# Allegro board 980K2-260817_261120-1.brd

Outline 419.1 x 474.98 mm; copper layers: TOP, L02_GND, L03_DP, L04_GND, L05_DP, L06_GND, L07_VI, L08_GND, L09_VI, L10_GND, L11_VI, L12_GND, L13_VI, L14_GND, L15_5V, L16_5V, L17_C-BIT, L18_C-BIT, L19_GND, L20_VI, L21_GND, L22_VI, L23_GND, L24_VI, L25_GND, L26_VI, L27_GND, L28_DP, L29_GND, L30_DP, L31_GND, BOTTOM. Coordinates in mm from the lower left corner of the outline.

## Placement (name value [footprint] x y rotation side)
BC9  0.1U-50-X-S4-TDK  [C0402]  86.11 107.82 180 bottom
BR5  1K-1-S4  [R0402]  86.11 106.3 0 bottom
BR6  1K-1-S4  [R0402]  86.11 103.5 0 bottom
BR7  0-5-S6  [R0603]  83.44 106.3 180 bottom
BR8  0-5-S4  [R0402]  86.11 105.03 180 bottom
BR9  0-5-S4  [R0402]  86.11 102.24 180 bottom
BU1  AT24C512C-SSHM-T-SOIC8  [SO8_206X127MM]  91.06 105.66 180 bottom
C48  0.01U-100-X7R-S6-MU  [C0603]  147.57 273.87 90 bottom
C49  0.01U-100-X7R-S6-MU  [C0603]  136.27 268.99 270 bottom
C50  0.01U-100-X7R-S6-MU  [C0603]  142.28 268.54 270 bottom
C53  1U-16-X5R-S4-YA  [C0402]  142.24 261.62 270 bottom
C54  2.2U-16-X-S4-MU  [C0402]  136.53 261.62 270 bottom
C58  1U-16-X5R-S4-YA  [C0402]  142.11 257.68 270 bottom
C59  4.7U-100-X-SB-MU  [C1210]  140.59 246.51 270 bottom
C60  0.01U-100-X7R-S6-MU  [C0603]  147.01 259.72 0 bottom
C61  0.01U-100-X7R-S6-MU  [C0603]  156.88 264.78 180 bottom
C62  2.2U-16-X-S4-MU  [C0402]  157.07 259.72 0 bottom
C63  0.01U-100-X7R-S6-MU  [C0603]  157.73 261.82 90 bottom
C64  0.01U-100-X7R-S6-MU  [C0603]  156.88 267.82 180 bottom
C65  0.1U-25-X7R-S4-MU  [C0402]  157.73 271.37 90 bottom
C66  0.1U-25-X7R-S4-MU  [C0402]  152.65 276.61 180 bottom
C67  0.1U-25-X7R-S4-MU  [C0402]  150.24 278.13 180 bottom
C68  0.1U-25-X7R-S4-MU  [C0402]  147.83 282.7 180 bottom
C69  0.01U-100-X7R-S6-MU  [C0603]  151.96 259.72 0 bottom
C70  0.1U-25-X7R-S4-MU  [C0402]  122.8 294.89 180 bottom
C71  0.1U-25-X7R-S4-MU  [C0402]  129.42 294.89 180 bottom
C72  0.1U-25-X7R-S4-MU  [C0402]  158.75 227.33 0 bottom
C73  0.1U-25-X7R-S4-MU  [C0402]  153.67 227.33 0 bottom
C74  0.1U-25-X7R-S4-MU  [C0402]  157.73 273.91 90 bottom
CT1  47U-16-X5R-SB-MU  [C1210]  88.14 153.16 180 bottom
CT2  10U-16-X5R-S8-TY  [C0805]  108.2 164.59 90 bottom
CT3  22U-16-X-S8-MU  [C0805]  110.49 164.59 90 bottom
CT7  47U-16-X5R-SB-MU  [C1210]  88.14 132.84 180 bottom
CT8  10U-16-X5R-S8-TY  [C0805]  110.49 144.27 90 bottom
CT9  22U-16-X-S8-MU  [C0805]  108.2 144.27 90 bottom
F1  C1F8-0.25A-SA  [FUSE_1206_H1P05MM]  88.14 156.72 0 bottom
F2  C1F8-0.25A-SA  [FUSE_1206_H1P05MM]  88.14 136.4 0 bottom
FD1  -  [FD_040_V2]  95.25 123.19 0 top
FD2  -  [FD_040_V2]  323.85 123.19 0 top
FD3  -  [FD_040_V2]  323.85 351.79 0 top
FD4  -  [FD_040_V2]  95.25 351.79 0 top
FD5  -  [FD_040_V2]  323.85 123.19 180 bottom
FD6  -  [FD_040_V2]  95.25 123.19 180 bottom
FD7  -  [FD_040_V2]  95.25 351.79 180 bottom
FD8  -  [FD_040_V2]  323.85 351.79 180 bottom
FD9  -  [FD_040_V2]  19.05 123.19 0 top
FD10  -  [FD_040_V2]  400.05 123.19 0 top
FD11  -  [FD_040_V2]  400.05 351.79 0 top
FD12  -  [FD_040_V2]  19.05 351.79 0 top
FD13  -  [FD_040_V2]  400.05 123.19 180 bottom
FD14  -  [FD_040_V2]  19.05 123.19 180 bottom
FD15  -  [FD_040_V2]  19.05 351.79 180 bottom
FD16  -  [FD_040_V2]  400.05 351.79 180 bottom
K1  UA2-5NJ-A-V3  [RL_NECUA2_5V_V3]  138.43 290.63 270 bottom
K2  G3VM-201DR  [RL_G3VM201DR_200V]  144.15 277.5 0 bottom
K3  G3VM-201DR  [RL_G3VM201DR_200V]  134.49 273.18 90 bottom
K4  G3VM-201DR  [RL_G3VM201DR_200V]  144.15 291.47 0 bottom
K5  G3VM-51UR-5V-VSON4  [RL_G3VM_4P_VSON4]  139.95 268.99 0 bottom
K6  G3VM-51UR-5V-VSON4  [RL_G3VM_4P_VSON4]  139.95 266.19 0 bottom
K7  G3VM-51UR-5V-VSON4  [RL_G3VM_4P_VSON4]  139.95 264.16 0 bottom
K8  G3VM-51UR-5V-VSON4  [RL_G3VM_4P_VSON4]  139.95 261.62 0 bottom
K9  G3VM-51UR-5V-VSON4  [RL_G3VM_4P_VSON4]  134.24 261.62 0 bottom
K10  G3VM-51UR-5V-VSON4  [RL_G3VM_4P_VSON4]  135.38 264.16 0 bottom
K11  G3VM-51UR-5V-VSON4  [RL_G3VM_4P_VSON4]  143.76 257.3 90 bottom
K12  G3VM-51UR-5V-VSON4  [RL_G3VM_4P_VSON4]  143.76 252.48 90 bottom
K13  G3VM-51UR-5V-VSON4  [RL_G3VM_4P_VSON4]  143.76 246.51 90 bottom
K14  G3VM-51UR-5V-VSON4  [RL_G3VM_4P_VSON4]  146.56 252.48 90 bottom
K15  UA2-5NJ-A-V3  [RL_NECUA2_5V_V3]  135.25 242.75 270 bottom
K16  G3VM-51UR-5V-VSON4  [RL_G3VM_4P_VSON4]  146.56 257.3 90 bottom
K17  G3VM-51UR-5V-VSON4  [RL_G3VM_4P_VSON4]  148.72 257.3 90 bottom
K18  G3VM-51UR-5V-VSON4  [RL_G3VM_4P_VSON4]  148.72 252.48 90 bottom
K19  G3VM-51UR-5V-VSON4  [RL_G3VM_4P_VSON4]  151.51 257.3 90 bottom
K20  G3VM-51UR-5V-VSON4  [RL_G3VM_4P_VSON4]  151.51 252.48 90 bottom
K21  G3VM-51UR-5V-VSON4  [RL_G3VM_4P_VSON4]  153.67 257.3 90 bottom
K22  G3VM-51UR-5V-VSON4  [RL_G3VM_4P_VSON4]  153.67 252.48 90 bottom
K23  UA2-5NJ-A-V3  [RL_NECUA2_5V_V3]  152.78 242.75 270 bottom
K24  UA2-5NJ-A-V3  [RL_NECUA2_5V_V3]  161.04 242.75 270 bottom
K25  G3VM-51UR-5V-VSON4  [RL_G3VM_4P_VSON4]  156.97 257.3 90 bottom
K26  G3VM-51UR-5V-VSON4  [RL_G3VM_4P_VSON4]  156.97 252.48 90 bottom
K27  G3VM-51UR-5V-VSON4  [RL_G3VM_4P_VSON4]  160.15 261.37 180 bottom
K28  G3VM-51UR-5V-VSON4  [RL_G3VM_4P_VSON4]  164.72 261.37 180 bottom
K29  G3VM-51UR-5V-VSON4  [RL_G3VM_4P_VSON4]  169.29 261.37 180 bottom
K30  G3VM-51UR-5V-VSON4  [RL_G3VM_4P_VSON4]  160.15 265.18 180 bottom
K31  G3VM-51UR-5V-VSON4  [RL_G3VM_4P_VSON4]  164.72 265.18 180 bottom
K32  G3VM-51UR-5V-VSON4  [RL_G3VM_4P_VSON4]  169.29 265.18 180 bottom
K33  G3VM-51UR-5V-VSON4  [RL_G3VM_4P_VSON4]  160.15 268.22 180 bottom
K34  G3VM-51UR-5V-VSON4  [RL_G3VM_4P_VSON4]  164.72 268.22 180 bottom
K35  G3VM-51UR-5V-VSON4  [RL_G3VM_4P_VSON4]  169.29 268.22 180 bottom
K36  G3VM-51UR-5V-VSON4  [RL_G3VM_4P_VSON4]  160.15 271.27 180 bottom
K37  G3VM-51UR-5V-VSON4  [RL_G3VM_4P_VSON4]  164.72 271.27 180 bottom
K38  G3VM-51UR-5V-VSON4  [RL_G3VM_4P_VSON4]  160.15 273.81 180 bottom
K39  G3VM-51UR-5V-VSON4  [RL_G3VM_4P_VSON4]  164.72 273.81 180 bottom
K40  G3VM-51UR-5V-VSON4  [RL_G3VM_4P_VSON4]  155.58 273.05 270 bottom
K41  G3VM-51UR-5V-VSON4  [RL_G3VM_4P_VSON4]  155.58 277.62 270 bottom
K42  G3VM-51UR-5V-VSON4  [RL_G3VM_4P_VSON4]  155.58 282.19 270 bottom
K43  G3VM-51UR-5V-VSON4  [RL_G3VM_4P_VSON4]  152.65 273.05 270 bottom
K44  G3VM-51UR-5V-VSON4  [RL_G3VM_4P_VSON4]  152.65 278.89 270 bottom
K45  G3VM-51UR-5V-VSON4  [RL_G3VM_4P_VSON4]  152.65 283.46 270 bottom
K46  G3VM-51UR-5V-VSON4  [RL_G3VM_4P_VSON4]  150.24 274.57 270 bottom
K47  G3VM-51UR-5V-VSON4  [RL_G3VM_4P_VSON4]  150.24 280.42 270 bottom
K48  G3VM-51UR-5V-VSON4  [RL_G3VM_4P_VSON4]  150.24 284.99 270 bottom
K49  G3VM-51UR-5V-VSON4  [RL_G3VM_4P_VSON4]  147.83 284.99 270 bottom
K50  G3VM-51UR-5V-VSON4  [RL_G3VM_4P_VSON4]  147.83 279.15 270 bottom
K51  G3VM-51UR-5V-VSON4  [RL_G3VM_4P_VSON4]  148.72 246.51 270 bottom
K52  G3VM-51UR-5V-VSON4  [RL_G3VM_4P_VSON4]  148.72 241.17 90 bottom
K53  G3VM-51UR-5V-VSON4  [RL_G3VM_4P_VSON4]  156.97 246.51 270 bottom
K54  G3VM-51UR-5V-VSON4  [RL_G3VM_4P_VSON4]  156.97 241.17 90 bottom
K55  G3VM-51UR-5V-VSON4  [RL_G3VM_4P_VSON4]  123.44 292.35 0 bottom
K56  G3VM-201DR  [RL_G3VM201DR_200V]  128.4 288.67 90 bottom
K57  G3VM-51UR-5V-VSON4  [RL_G3VM_4P_VSON4]  158.12 234.57 270 bottom
K58  G3VM-51UR-5V-VSON4  [RL_G3VM_4P_VSON4]  156.08 234.57 270 bottom
K59  G3VM-51UR-5V-VSON4  [RL_G3VM_4P_VSON4]  153.04 234.57 270 bottom
K60  G3VM-51UR-5V-VSON4  [RL_G3VM_4P_VSON4]  151 234.57 270 bottom
K61  G3VM-51UR-5V-VSON4  [RL_G3VM_4P_VSON4]  130.05 292.35 0 bottom
LD1  LDG-2-S6  [LED_0603]  88.91 165.19 0 top
LD3  LDG-2-S6  [LED_0603]  88.91 144.87 0 top
LT1  L10U-16A-S16.5X15.5-PU  [IND_16P5X15P5MM]  98.93 156.59 0 bottom
LT3  L10U-16A-S16.5X15.5-PU  [IND_16P5X15P5MM]  98.93 136.27 0 bottom
M1  PG_LTXDX_F_X1_OUTLINE_TD_V2  [PG_LTXDX_F_X1_OUTLINE_TD_COHU]  209.55 237.49 0 top
NOREF  -  []  208.42 208.62 0 top
NOREF#2  -  []  151.95 178.07 0 top
NOREF#3  -  []  151.79 256.75 0 top
NOREF#4  -  []  193.27 198.18 0 top
NOREF#5  -  []  133.45 244.35 0 top
NOREF#6  -  []  104.35 456.29 0 top
NOREF#7  -  []  198.11 172.1 0 top
NOREF#8  -  []  88.16 144.87 0 top
NOREF#9  -  []  275.05 214.25 0 top
NOREF#10  -  []  146.83 256.75 0 top
NOREF#11  -  []  164.64 181.15 90 top
NOREF#12  -  []  302.59 389.27 90 top
NOREF#13  -  []  241.44 184.35 0 top
NOREF#14  -  []  279.22 239.57 90 top
NOREF#15  -  []  253.78 207.01 0 top
NOREF#16  -  []  226.96 191.6 90 top
NOREF#17  -  []  232.25 272.17 0 top
NOREF#18  -  []  188.19 247.71 0 top
NOREF#19  -  []  100.95 17.15 90 top
NOREF#20  -  []  135.15 265.24 0 top
NOREF#21  -  []  164.95 204.23 90 top
NOREF#22  -  []  189.84 273.7 0 top
NOREF#23  -  []  145.42 286.99 90 top
NOREF#24  -  []  196.7 193.03 90 top
NOREF#25  -  []  277.25 256.75 0 top
NOREF#26  -  []  236.1 280.99 90 top
NOREF#27  -  []  125.25 291.4 0 top
NOREF#28  -  []  151.46 167 0 top
NOREF#29  -  []  142.03 229.03 90 top
NOREF#30  -  []  266.69 297.01 90 top
NOREF#31  -  []  168.42 260.97 90 top
NOREF#32  -  []  150.97 179.57 90 top
NOREF#33  -  []  213.78 267.01 0 top
NOREF#34  -  []  159.27 265.58 0 top
NOREF#35  -  []  128.94 221.73 0 top
NOREF#36  -  []  271.79 191.93 0 top
NOREF#37  -  []  239.72 223.79 90 top
NOREF#38  -  []  215.02 268.14 90 top
NOREF#39  -  []  249.52 200.42 90 top
NOREF#40  -  []  228.99 240.62 0 top
NOREF#41  -  []  267.3 226.19 0 top
NOREF#42  -  []  248.54 260.64 90 top
NOREF#43  -  []  188.32 253.35 0 top
NOREF#44  -  []  227.8 265.39 90 top
NOREF#45  -  []  137.25 176.5 90 top
NOREF#46  -  []  293.99 17.15 0 top
NOREF#47  -  []  180.95 206.12 90 top
NOREF#48  -  []  132.55 224.49 0 top
NOREF#49  -  []  246.32 206.13 0 top
NOREF#50  -  []  169.52 267.27 90 top
NOREF#51  -  []  203.84 270.87 90 top
NOREF#52  -  []  156.7 197.85 90 top
NOREF#53  -  []  266.83 251.93 0 top
NOREF#54  -  []  230.98 184.35 0 top
NOREF#55  -  []  199.06 238.07 0 top
NOREF#56  -  []  156.1 211.85 90 top
NOREF#57  -  []  185.41 273.02 90 top
NOREF#58  -  []  190.73 19.69 90 top
NOREF#59  -  []  215.84 202.57 90 top
NOREF#60  -  []  185.42 274.72 90 top
NOREF#61  -  []  91.03 148.19 0 top
NOREF#62  -  []  159.4 267.5 90 top
NOREF#63  -  []  277.5 185.31 90 top
NOREF#64  -  []  191.53 173.37 90 top
NOREF#65  -  []  168.54 268.95 0 top
NOREF#66  -  []  228.32 198.18 0 top
NOREF#67  -  []  191.73 172.54 0 top
NOREF#68  -  []  179.73 178.35 0 top
NOREF#69  -  []  209.49 220.89 0 top
NOREF#70  -  []  210.02 214.45 0 top
NOREF#71  -  []  323.77 454.29 90 top
NOREF#72  -  []  123.91 295.42 90 top
NOREF#73  -  []  203.97 274.54 0 top
NOREF#74  -  []  259.08 261.22 0 top
NOREF#75  -  []  260.95 261.55 90 top
NOREF#76  -  []  157.71 173.69 0 top
NOREF#77  -  []  191.19 288.49 0 top
NOREF#78  -  []  156.1 220.99 90 top
NOREF#79  -  []  190.77 279.22 90 top
NOREF#80  -  []  154.84 18.69 90 top
NOREF#81  -  []  188.32 258.18 0 top
NOREF#82  -  []  249.52 267.27 90 top
NOREF#83  -  []  143.61 396.29 0 top
NOREF#84  -  []  193.39 197.85 90 top
NOREF#85  -  []  148.44 257.85 90 top
NOREF#86  -  []  270.98 244.35 0 top
NOREF#87  -  []  260.83 268.59 90 top
NOREF#88  -  []  239.4 213.09 90 top
NOREF#89  -  []  289.52 204.23 90 top
NOREF#90  -  []  250.92 291.95 90 top
NOREF#91  -  []  250.89 209.17 0 top
NOREF#92  -  []  245.38 226.23 0 top
NOREF#93  -  []  264.04 191.93 0 top
NOREF#94  -  []  192.25 218.02 0 top
NOREF#95  -  []  178.97 271.91 90 top
NOREF#96  -  []  262.87 213.02 0 top
NOREF#97  -  []  89.74 135.6 0 top
NOREF#98  -  []  173.34 17.15 90 top
NOREF#99  -  []  272.25 212.18 90 top
NOREF#100  -  []  194.07 196.43 90 top
NOREF#101  -  []  202.85 237.22 0 top
NOREF#102  -  []  288.54 267.5 90 top
NOREF#103  -  []  163.84 267.82 90 top
NOREF#104  -  []  147.43 218.27 0 top
NOREF#105  -  []  144.16 245.63 90 top
NOREF#106  -  []  181.55 209.94 90 top
NOREF#107  -  []  173.62 229.09 90 top
NOREF#108  -  []  230.77 273.37 90 top
NOREF#109  -  []  229.84 213.7 0 top
NOREF#110  -  []  265.41 286.99 90 top
NOREF#111  -  []  201.44 244.35 0 top
NOREF#112  -  []  274.39 286.59 90 top
NOREF#113  -  []  184.16 245.63 90 top
NOREF#114  -  []  149.84 224.11 0 top
NOREF#115  -  []  195.68 173.69 90 top
NOREF#116  -  []  158.04 228.3 0 top
NOREF#117  -  []  168.54 260.64 90 top
NOREF#118  -  []  255.02 268.14 90 top
NOREF#119  -  []  160.23 236.17 90 top
NOREF#120  -  []  250.89 202.32 0 top
NOREF#121  -  []  213.24 261.55 0 top
NOREF#122  -  []  178.35 271.84 0 top
NOREF#123  -  []  205.04 233.3 90 top
NOREF#124  -  []  243.84 200.97 90 top
NOREF#125  -  []  271.91 251.6 90 top
NOREF#126  -  []  235.58 202.67 90 top
NOREF#127  -  []  180.95 266.12 90 top
NOREF#128  -  []  178.35 269.04 0 top
NOREF#129  -  []  139.72 273.6 90 top
NOREF#130  -  []  199.06 178.07 0 top
NOREF#131  -  []  245.38 226.23 0 top
NOREF#132  -  []  146.28 193.03 90 top
NOREF#133  -  []  106.68 128.02 90 top
NOREF#134  -  []  243.84 214.21 0 top
NOREF#135  -  []  227.3 226.19 0 top
NOREF#136  -  []  265.61 252.78 0 top
NOREF#137  -  []  217.25 236.5 90 top
NOREF#138  -  []  155.68 173.69 90 top
NOREF#139  -  []  231.79 256.75 0 top
NOREF#140  -  []  231.11 258.18 0 top
NOREF#141  -  []  136.98 205.11 90 top
NOREF#142  -  []  244.64 241.15 90 top
NOREF#143  -  []  180.95 268.91 90 top
NOREF#144  -  []  187.3 226.19 0 top
NOREF#145  -  []  268.44 193.03 90 top
NOREF#146  -  []  273.6 282.39 0 top
NOREF#147  -  []  187.05 209.24 0 top
NOREF#148  -  []  258.95 201.55 0 top
NOREF#149  -  []  272.87 248.11 90 top
NOREF#150  -  []  321.5 18.69 0 top
NOREF#151  -  []  199.27 208.62 0 top
NOREF#152  -  []  243.84 273.41 90 top
NOREF#153  -  []  218.35 211.84 0 top
NOREF#154  -  []  138.56 246.51 0 top
NOREF#155  -  []  214.43 292.23 0 top
NOREF#156  -  []  243.84 260.97 90 top
NOREF#157  -  []  186.7 237.02 90 top
NOREF#158  -  []  214.07 270.89 90 top
NOREF#159  -  []  151.46 227 0 top
NOREF#160  -  []  170.92 291.95 90 top
NOREF#161  -  []  216.83 227.03 0 top
NOREF#162  -  []  276.1 220.99 90 top
NOREF#163  -  []  211.05 232.28 90 top
NOREF#164  -  []  129.36 361.96 0 top
NOREF#165  -  []  207.98 226.38 90 top
NOREF#166  -  []  275.17 212.18 0 top
NOREF#167  -  []  232.25 222.59 0 top
NOREF#168  -  []  269.84 279.54 0 top
NOREF#169  -  []  80.49 155.57 0 top
NOREF#170  -  []  235.17 276.75 0 top
NOREF#171  -  []  155.17 272.17 0 top
NOREF#172  -  []  159.4 202.09 0 top
NOREF#173  -  []  230.97 239.57 90 top
NOREF#174  -  []  243.04 236.5 90 top
NOREF#175  -  []  229.84 273.7 90 top
NOREF#176  -  []  216.26 263.76 90 top
NOREF#177  -  []  201.12 248.11 90 top
NOREF#178  -  []  152.13 220.09 0 top
NOREF#179  -  []  209.55 237.49 90 top
NOREF#180  -  []  239.65 212.56 0 top
NOREF#181  -  []  173.34 17.15 0 top
NOREF#182  -  []  195.17 281.32 90 top
NOREF#183  -  []  196.02 257.6 0 top
NOREF#184  -  []  279.27 264.78 90 top
NOREF#185  -  []  183.49 253.03 90 top
NOREF#186  -  []  188.99 191.93 0 top
NOREF#187  -  []  144.04 251.93 0 top
NOREF#188  -  []  208.54 207.5 90 top
NOREF#189  -  []  153.03 172.1 0 top
NOREF#190  -  []  208.42 268.62 0 top
NOREF#191  -  []  261.03 267.69 90 top
NOREF#192  -  []  231.19 288.49 0 top
NOREF#193  -  []  211.14 458.49 0 top
NOREF#194  -  []  276.61 233.37 90 top
NOREF#195  -  []  204.95 272.86 90 top
NOREF#196  -  []  270.97 250.88 90 top
NOREF#197  -  []  182.81 252.78 0 top
NOREF#198  -  []  269.72 286.19 0 top
NOREF#199  -  []  118.64 291.4 90 top
NOREF#200  -  []  271.19 218.07 0 top
NOREF#201  -  []  117.23 452.29 90 top
NOREF#202  -  []  251.65 293.3 90 top
NOREF#203  -  []  188.32 182.05 0 top
NOREF#204  -  []  239.4 214.54 0 top
NOREF#205  -  []  254.04 210.63 90 top
NOREF#206  -  []  273.18 184.35 0 top
NOREF#207  -  []  279.4 214.54 0 top
NOREF#208  -  []  150.88 228.6 90 top
NOREF#209  -  []  230.77 223.79 90 top
NOREF#210  -  []  168.94 221.73 0 top
NOREF#211  -  []  191.87 396.29 0 top
NOREF#212  -  []  270.77 273.37 90 top
NOREF#213  -  []  267.05 269.24 0 top
NOREF#214  -  []  269.12 196.43 90 top
NOREF#215  -  []  229.24 185.31 90 top
NOREF#216  -  []  186.16 253.35 0 top
NOREF#217  -  []  271.95 178.07 0 top
NOREF#218  -  []  214.38 264.09 0 top
NOREF#219  -  []  231.79 196.75 0 top
NOREF#220  -  []  147.05 269.24 0 top
NOREF#221  -  []  196.1 280.99 90 top
NOREF#222  -  []  269.12 240.3 90 top
NOREF#223  -  []  208.42 267.82 90 top
NOREF#224  -  []  233.18 222.26 90 top
NOREF#225  -  []  180.83 268.59 90 top
NOREF#226  -  []  224.16 196.43 90 top
NOREF#227  -  []  274.39 216.17 90 top
NOREF#228  -  []  218.95 206.12 0 top
NOREF#229  -  []  119.48 456.29 90 top
NOREF#230  -  []  235.68 233.69 0 top
NOREF#231  -  []  226.16 212.17 90 top
NOREF#232  -  []  204.95 200.42 90 top
NOREF#233  -  []  229.84 284.11 90 top
NOREF#234  -  []  266.28 193.03 90 top
NOREF#235  -  []  271.18 239.15 0 top
NOREF#236  -  []  248.54 262.09 0 top
NOREF#237  -  []  253.64 239.09 0 top
NOREF#238  -  []  157.25 196.75 0 top
NOREF#239  -  []  255.65 244.35 0 top
NOREF#240  -  []  191.76 227.33 0 top
NOREF#241  -  []  140.95 201.55 90 top
NOREF#242  -  []  255.02 208.14 90 top
NOREF#243  -  []  227.43 218.27 90 top
NOREF#244  -  []  255.11 201.22 90 top
NOREF#245  -  []  284.95 267.27 90 top
NOREF#246  -  []  198.11 232.1 0 top
NOREF#247  -  []  190.77 213.37 90 top
NOREF#248  -  []  212.64 264.47 0 top
NOREF#249  -  []  244.64 181.15 90 top
NOREF#250  -  []  152.46 247.68 90 top
NOREF#251  -  []  168.54 267.5 90 top
NOREF#252  -  []  95.33 20.69 90 top
NOREF#253  -  []  159.4 208.95 0 top
NOREF#254  -  []  131.26 184.35 0 top
NOREF#255  -  []  156.7 241.72 90 top
NOREF#256  -  []  238.99 19.69 90 top
NOREF#257  -  []  241.12 188.11 90 top
NOREF#258  -  []  89.76 165.64 0 top
NOREF#259  -  []  145.42 273.02 90 top
NOREF#260  -  []  266.28 253.03 90 top
NOREF#261  -  []  252.55 284.49 0 top
NOREF#262  -  []  262.81 246.81 0 top
NOREF#263  -  []  149.12 256.43 90 top
NOREF#264  -  []  106.68 128.02 0 top
NOREF#265  -  []  134.43 292.23 0 top
NOREF#266  -  []  226.16 226.14 90 top
NOREF#267  -  []  239.4 202.09 0 top
NOREF#268  -  []  136.5 285.91 90 top
NOREF#269  -  []  211.65 293.3 90 top
NOREF#270  -  []  271.19 228.49 0 top
NOREF#271  -  []  149.84 284.11 90 top
NOREF#272  -  []  138.95 264.09 0 top
NOREF#273  -  []  268.81 195.7 90 top
NOREF#274  -  []  150.98 244.35 0 top
NOREF#275  -  []  237.37 196.43 90 top
NOREF#276  -  []  236.54 167 0 top
NOREF#277  -  []  172.55 250.49 90 top
NOREF#278  -  []  203.97 214.54 0 top
NOREF#279  -  []  279.44 179.15 0 top
NOREF#280  -  []  132.26 248.4 0 top
NOREF#281  -  []  168.45 295.2 0 top
NOREF#282  -  []  192.25 222.59 0 top
NOREF#283  -  []  260.59 244.98 90 top
NOREF#284  -  []  191.11 200.17 90 top
NOREF#285  -  []  290.89 269.17 0 top
NOREF#286  -  []  284.95 212.86 90 top
NOREF#287  -  []  183.49 197.85 90 top
NOREF#288  -  []  268.32 242.05 0 top
NOREF#289  -  []  272.11 171.4 0 top
NOREF#290  -  []  271.11 198.18 0 top
NOREF#291  -  []  268.78 288.49 0 top
NOREF#292  -  []  276.57 258.18 0 top
NOREF#293  -  []  150.15 266.89 90 top
NOREF#294  -  []  156.02 181.47 0 top
NOREF#295  -  []  154.07 196.43 90 top
NOREF#296  -  []  269.84 213.7 90 top
NOREF#297  -  []  271.24 193.03 90 top
NOREF#298  -  []  235.92 195.7 90 top
NOREF#299  -  []  278.13 389.27 90 top
NOREF#300  -  []  273.18 211.85 90 top
NOREF#301  -  []  288.54 200.64 90 top
NOREF#302  -  []  239.4 262.09 0 top
NOREF#303  -  []  209.55 237.49 0 top
NOREF#304  -  []  85.59 155.57 90 top
NOREF#305  -  []  205.38 286.23 0 top
NOREF#306  -  []  148.32 198.18 0 top
NOREF#307  -  []  133.95 281.02 90 top
NOREF#308  -  []  269.84 219.54 90 top
NOREF#309  -  []  203.97 273.09 90 top
NOREF#310  -  []  253.24 261.55 0 top
NOREF#311  -  []  243.84 268.62 0 top
NOREF#312  -  []  163.97 268.95 0 top
NOREF#313  -  []  151.7 280.49 90 top
NOREF#314  -  []  211.25 184.35 0 top
NOREF#315  -  []  232.63 173.69 90 top
NOREF#316  -  []  227.43 284.11 0 top
NOREF#317  -  []  183.49 257.85 90 top
NOREF#318  -  []  233.76 250.88 90 top
NOREF#319  -  []  172.87 287.4 90 top
NOREF#320  -  []  159.27 271.67 0 top
NOREF#321  -  []  136.63 292.23 0 top
NOREF#322  -  []  219.73 178.35 0 top
NOREF#323  -  []  294.09 207.27 90 top
NOREF#324  -  []  228.44 181.72 90 top
NOREF#325  -  []  239.27 211.67 0 top
NOREF#326  -  []  273.27 253.35 0 top
NOREF#327  -  []  220.95 266.12 90 top
NOREF#328  -  []  141.55 202.57 90 top
NOREF#329  -  []  209.55 237.49 0 top
NOREF#330  -  []  131.05 245.49 90 top
NOREF#331  -  []  276.52 281.12 0 top
NOREF#332  -  []  99.98 392.33 90 top
NOREF#333  -  []  194.39 216.17 90 top
NOREF#334  -  []  243.84 207.82 90 top
NOREF#335  -  []  163.97 265.9 0 top
NOREF#336  -  []  171.05 185.49 90 top
NOREF#337  -  []  84.45 359.42 0 top
NOREF#338  -  []  229.84 224.11 90 top
NOREF#339  -  []  157.03 178.07 0 top
NOREF#340  -  []  151.79 251.93 0 top
NOREF#341  -  []  211.25 184.35 0 top
NOREF#342  -  []  214.04 210.63 90 top
NOREF#343  -  []  141.85 246.47 0 top
NOREF#344  -  []  199.27 268.62 0 top
NOREF#345  -  []  174.43 292.23 0 top
NOREF#346  -  []  272.13 220.09 0 top
NOREF#347  -  []  190.77 273.37 90 top
NOREF#348  -  []  203.97 262.09 0 top
NOREF#349  -  []  271.18 179.15 0 top
NOREF#350  -  []  151.24 257.85 90 top
NOREF#351  -  []  203.4 296.38 0 top
NOREF#352  -  []  244.95 207.27 90 top
NOREF#353  -  []  163.84 268.62 0 top
NOREF#354  -  []  226.01 190.88 90 top
NOREF#355  -  []  248.54 264.45 90 top
NOREF#356  -  []  184.04 191.93 0 top
NOREF#357  -  []  180.95 204.09 90 top
NOREF#358  -  []  197.37 256.43 90 top
NOREF#359  -  []  152.63 232.86 0 top
NOREF#360  -  []  268.78 244.35 0 top
NOREF#361  -  []  228.44 193.03 90 top
NOREF#362  -  []  236.8 280.49 90 top
NOREF#363  -  []  122.2 178.35 0 top
NOREF#364  -  []  223.49 257.85 90 top
NOREF#365  -  []  190.15 266.89 90 top
NOREF#366  -  []  293.99 17.15 90 top
NOREF#367  -  []  156.57 258.18 0 top
NOREF#368  -  []  196.81 232.54 0 top
NOREF#369  -  []  243.92 229.94 0 top
NOREF#370  -  []  190.97 179.57 90 top
NOREF#371  -  []  175.11 261.22 90 top
NOREF#372  -  []  153.6 226.96 0 top
NOREF#373  -  []  264.04 251.93 0 top
NOREF#374  -  []  155.05 274.25 0 top
NOREF#375  -  []  191.95 238.07 0 top
NOREF#376  -  []  268.99 256.75 0 top
NOREF#377  -  []  129.44 260.67 0 top
NOREF#378  -  []  183.49 247.06 90 top
NOREF#379  -  []  153.83 172.21 90 top
NOREF#380  -  []  241.75 212.22 0 top
NOREF#381  -  []  131.05 232.28 90 top
NOREF#382  -  []  196.84 227.33 0 top
NOREF#383  -  []  182.81 197.6 0 top
NOREF#384  -  []  159.27 211.67 0 top
NOREF#385  -  []  232.13 284.66 0 top
NOREF#386  -  []  156.57 242.05 0 top
NOREF#387  -  []  203.04 176.5 90 top
NOREF#388  -  []  233.94 191.93 0 top
NOREF#389  -  []  222.03 229.03 90 top
NOREF#390  -  []  152.25 222.59 90 top
NOREF#391  -  []  273.18 244.35 0 top
NOREF#392  -  []  157.25 240.62 0 top
NOREF#393  -  []  249.17 291.95 0 top
NOREF#394  -  []  189.84 219.54 0 top
NOREF#395  -  []  157.5 245.31 90 top
NOREF#396  -  []  213.65 239.15 0 top
NOREF#397  -  []  225.42 274.72 90 top
NOREF#398  -  []  146.16 258.18 0 top
NOREF#399  -  []  209.55 237.49 0 top
NOREF#400  -  []  191.24 193.03 90 top
NOREF#401  -  []  228.99 196.75 0 top
NOREF#402  -  []  152.25 212.18 0 top
NOREF#403  -  []  202.44 232.28 0 top
NOREF#404  -  []  149.72 281.62 0 top
NOREF#405  -  []  236.61 233.37 90 top
NOREF#406  -  []  275.17 216.75 90 top
NOREF#407  -  []  248.42 201.77 0 top
NOREF#408  -  []  169.52 260.42 90 top
NOREF#409  -  []  231.98 280.75 90 top
NOREF#410  -  []  193.18 277.69 90 top
NOREF#411  -  []  274.78 176.5 90 top
NOREF#412  -  []  264.24 20.69 90 top
NOREF#413  -  []  231.73 232.54 0 top
NOREF#414  -  []  260.95 268.91 90 top
NOREF#415  -  []  232.25 278.02 0 top
NOREF#416  -  []  157.25 251.93 0 top
NOREF#417  -  []  267.99 238.35 0 top
NOREF#418  -  []  181.55 269.94 90 top
NOREF#419  -  []  269.84 284.11 90 top
NOREF#420  -  []  184.04 245.96 0 top
NOREF#421  -  []  192.13 224.66 0 top
NOREF#422  -  []  288.54 262.09 0 top
NOREF#423  -  []  211.21 234.89 90 top
NOREF#424  -  []  263.89 185.24 90 top
NOREF#425  -  []  176.55 220.49 0 top
NOREF#426  -  []  253.36 261.22 0 top
NOREF#427  -  []  164.95 200.42 90 top
NOREF#428  -  []  289.52 267.27 90 top
NOREF#429  -  []  138.95 206.12 0 top
NOREF#430  -  []  152.25 218.02 0 top
NOREF#431  -  []  210.89 202.32 0 top
NOREF#432  -  []  93.68 136.27 0 top
NOREF#433  -  []  196.52 281.12 0 top
NOREF#434  -  []  188.35 217.95 90 top
NOREF#435  -  []  236.57 185.63 0 top
NOREF#436  -  []  219.55 180.49 90 top
NOREF#437  -  []  138.95 261.55 0 top
NOREF#438  -  []  199.27 213.41 90 top
NOREF#439  -  []  199.4 212 0 top
NOREF#440  -  []  196.79 231.3 0 top
NOREF#441  -  []  151.11 258.18 0 top
NOREF#442  -  []  150.77 213.37 90 top
NOREF#443  -  []  141.03 207.69 90 top
NOREF#444  -  []  227.8 204.99 90 top
NOREF#445  -  []  86.61 132.84 0 top
NOREF#446  -  []  213.45 244.35 0 top
NOREF#447  -  []  186.83 196.75 0 top
NOREF#448  -  []  218.35 204.47 0 top
NOREF#449  -  []  266.96 191.6 90 top
NOREF#450  -  []  233.39 253.03 90 top
NOREF#451  -  []  221.85 292.49 0 top
NOREF#452  -  []  232.51 235.77 0 top
NOREF#453  -  []  192.13 274.25 0 top
NOREF#454  -  []  224.04 191.93 0 top
NOREF#455  -  []  237.92 250.01 0 top
NOREF#456  -  []  270.88 168.6 90 top
NOREF#457  -  []  281.12 188.11 90 top
NOREF#458  -  []  273.27 193.35 0 top
NOREF#459  -  []  170.02 274.45 0 top
NOREF#460  -  []  157.03 238.07 0 top
NOREF#461  -  []  228.32 242.05 0 top
NOREF#462  -  []  197.71 173.69 0 top
NOREF#463  -  []  203.97 208.95 0 top
NOREF#464  -  []  151.71 231.3 0 top
NOREF#465  -  []  135.84 202.57 90 top
NOREF#466  -  []  224.04 251.93 0 top
NOREF#467  -  []  123.4 236.38 0 top
NOREF#468  -  []  267.8 264.99 90 top
NOREF#469  -  []  207.95 226.12 90 top
NOREF#470  -  []  159.27 268.62 0 top
NOREF#471  -  []  145.42 214.72 90 top
NOREF#472  -  []  209.52 270.32 90 top
NOREF#473  -  []  266.01 195.7 90 top
NOREF#474  -  []  184.16 256.43 90 top
NOREF#475  -  []  193.6 276.55 0 top
NOREF#476  -  []  231.18 179.15 0 top
NOREF#477  -  []  228.81 190.88 90 top
NOREF#478  -  []  188.44 193.03 90 top
NOREF#479  -  []  251.05 232.28 90 top
NOREF#480  -  []  247.98 286.38 90 top
NOREF#481  -  []  156.02 192.78 0 top
NOREF#482  -  []  271.11 193.35 0 top
NOREF#483  -  []  233.83 172.21 90 top
NOREF#484  -  []  192.25 282.59 0 top
NOREF#485  -  []  191.91 191.6 90 top
NOREF#486  -  []  288.42 260.97 90 top
NOREF#487  -  []  232.87 248.11 90 top
NOREF#488  -  []  187.01 458.49 0 top
NOREF#489  -  []  232.25 272.17 90 top
NOREF#490  -  []  227.77 252.78 0 top
NOREF#491  -  []  258.35 207.01 0 top
NOREF#492  -  []  270.15 206.89 90 top
NOREF#493  -  []  171.05 245.49 90 top
NOREF#494  -  []  147.43 218.27 90 top
NOREF#495  -  []  277.18 176.17 90 top
NOREF#496  -  []  163.97 213.09 90 top
NOREF#497  -  []  161.84 235.2 0 top
NOREF#498  -  []  250.89 206.13 0 top
NOREF#499  -  []  276.38 181.15 90 top
NOREF#500  -  []  283.97 270.55 90 top
NOREF#501  -  []  281.75 269.17 0 top
NOREF#502  -  []  181.03 267.69 90 top
NOREF#503  -  []  163.97 212 0 top
NOREF#504  -  []  268.19 187.71 0 top
NOREF#505  -  []  309.55 14.59 90 top
NOREF#506  -  []  191.95 178.07 0 top
NOREF#507  -  []  199.4 200.64 90 top
NOREF#508  -  []  258.85 241.15 90 top
NOREF#509  -  []  275.05 218.82 0 top
NOREF#510  -  []  283.97 208.95 0 top
NOREF#511  -  []  227.43 284.11 90 top
NOREF#512  -  []  243.97 213.09 90 top
NOREF#513  -  []  235.05 274.25 0 top
NOREF#514  -  []  196.33 167.9 90 top
NOREF#515  -  []  254.43 292.23 0 top
NOREF#516  -  []  191.71 231.3 0 top
NOREF#517  -  []  188.78 228.49 0 top
NOREF#518  -  []  179.72 213.6 90 top
NOREF#519  -  []  186.43 282.49 90 top
NOREF#520  -  []  195.68 173.69 0 top
NOREF#521  -  []  151.79 196.75 0 top
NOREF#522  -  []  148.19 247.71 0 top
NOREF#523  -  []  274.39 226.59 90 top
NOREF#524  -  []  268.78 222.65 0 top
NOREF#525  -  []  178.95 201.55 0 top
NOREF#526  -  []  153.56 173.37 90 top
NOREF#527  -  []  275.68 173.69 90 top
NOREF#528  -  []  139.72 213.6 90 top
NOREF#529  -  []  231.95 238.07 0 top
NOREF#530  -  []  248.42 265.58 0 top
NOREF#531  -  []  246.32 269.17 0 top
NOREF#532  -  []  267.77 252.78 0 top
NOREF#533  -  []  261.03 207.69 90 top
NOREF#534  -  []  190.6 233.69 0 top
NOREF#535  -  []  150.6 233.69 90 top
NOREF#536  -  []  254.51 263.76 0 top
NOREF#537  -  []  324.88 21.69 90 top
NOREF#538  -  []  251.25 184.35 0 top
NOREF#539  -  []  233.18 277.69 90 top
NOREF#540  -  []  156.57 193.35 0 top
NOREF#541  -  []  195.92 255.7 90 top
NOREF#542  -  []  191.79 196.75 0 top
NOREF#543  -  []  248.54 207.5 90 top
NOREF#544  -  []  243.84 208.62 0 top
NOREF#545  -  []  180.83 261.22 90 top
NOREF#546  -  []  88.14 151.13 90 top
NOREF#547  -  []  207.04 239.09 0 top
NOREF#548  -  []  153.18 271.85 90 top
NOREF#549  -  []  139.49 266.31 90 top
NOREF#550  -  []  193.39 193.03 90 top
NOREF#551  -  []  140.59 184.98 90 top
NOREF#552  -  []  174.09 207.27 90 top
NOREF#553  -  []  161.12 188.11 90 top
NOREF#554  -  []  150.41 228.7 90 top
NOREF#555  -  []  237.37 191.6 90 top
NOREF#556  -  []  284.64 241.15 90 top
NOREF#557  -  []  233.18 271.85 90 top
NOREF#558  -  []  152.72 247.68 0 top
NOREF#559  -  []  223.36 187.38 0 top
NOREF#560  -  []  175.24 261.55 90 top
NOREF#561  -  []  180.83 203.76 90 top
NOREF#562  -  []  131.26 244.35 0 top
NOREF#563  -  []  148.32 242.05 0 top
NOREF#564  -  []  228.32 245.63 0 top
NOREF#565  -  []  197.04 244.35 0 top
NOREF#566  -  []  174.09 260.42 90 top
NOREF#567  -  []  279.65 272.56 0 top
NOREF#568  -  []  279.72 279.22 90 top
NOREF#569  -  []  157.04 244.35 0 top
NOREF#570  -  []  193.18 184.35 0 top
NOREF#571  -  []  240.13 456.29 90 top
NOREF#572  -  []  94.87 108.59 0 top
NOREF#573  -  []  184.04 256.75 0 top
NOREF#574  -  []  199.4 214.54 0 top
NOREF#575  -  []  135.66 184.35 0 top
NOREF#576  -  []  283.84 270.87 90 top
NOREF#577  -  []  163.92 289.94 0 top
NOREF#578  -  []  159.72 214.65 90 top
NOREF#579  -  []  193.6 226.96 0 top
NOREF#580  -  []  187.77 252.78 0 top
NOREF#581  -  []  222.81 192.78 0 top
NOREF#582  -  []  279.27 268.62 0 top
NOREF#583  -  []  239.27 268.62 0 top
NOREF#584  -  []  190.6 233.69 90 top
NOREF#585  -  []  228.95 266.89 0 top
NOREF#586  -  []  173.78 267.01 0 top
NOREF#587  -  []  192.72 192.78 0 top
NOREF#588  -  []  221.55 269.94 90 top
NOREF#589  -  []  272.72 252.78 0 top
NOREF#590  -  []  220.43 284.38 90 top
NOREF#591  -  []  192.11 231.4 0 top
NOREF#592  -  []  195.17 221.32 0 top
NOREF#593  -  []  140.04 265.53 90 top
NOREF#594  -  []  90.48 16.49 0 top
NOREF#595  -  []  149.29 289.79 0 top
NOREF#596  -  []  191.18 179.15 0 top
NOREF#597  -  []  168.42 207.82 90 top
NOREF#598  -  []  226.01 250.88 90 top
NOREF#599  -  []  199.27 214.21 0 top
NOREF#600  -  []  261.55 205.11 90 top
NOREF#601  -  []  245.73 17.15 90 top
NOREF#602  -  []  148.95 266.89 0 top
NOREF#603  -  []  254.09 267.27 90 top
NOREF#604  -  []  154.33 267.37 90 top
NOREF#605  -  []  129.05 232.28 0 top
NOREF#606  -  []  199.4 208.95 0 top
NOREF#607  -  []  199.22 179.57 90 top
NOREF#608  -  []  244.61 234.24 90 top
NOREF#609  -  []  194.33 207.37 90 top
NOREF#610  -  []  94.87 102.74 90 top
NOREF#611  -  []  153.18 184.35 0 top
NOREF#612  -  []  259.55 294.49 0 top
NOREF#613  -  []  222.87 273.02 0 top
NOREF#614  -  []  136.26 263.76 90 top
NOREF#615  -  []  228.32 245.63 90 top
NOREF#616  -  []  216 456.29 0 top
NOREF#617  -  []  242.44 292.28 0 top
NOREF#618  -  []  236.7 257.85 90 top
NOREF#619  -  []  161.84 295.2 0 top
NOREF#620  -  []  271.71 171.3 0 top
NOREF#621  -  []  181.6 248.12 0 top
NOREF#622  -  []  248.54 268.95 0 top
NOREF#623  -  []  228.32 182.05 0 top
NOREF#624  -  []  276.7 197.85 90 top
NOREF#625  -  []  188.78 244.35 0 top
NOREF#626  -  []  211.05 245.49 90 top
NOREF#627  -  []  267.45 269.24 0 top
NOREF#628  -  []  139.08 265.79 0 top
NOREF#629  -  []  187.77 257.6 0 top
NOREF#630  -  []  170.89 269.17 0 top
NOREF#631  -  []  163.84 214.21 0 top
NOREF#632  -  []  197.37 180.3 90 top
NOREF#633  -  []  231.19 223.92 0 top
NOREF#634  -  []  136.26 203.76 90 top
NOREF#635  -  []  219.73 178.35 0 top
NOREF#636  -  []  227.43 278.27 0 top
NOREF#637  -  []  199.72 214.65 90 top
NOREF#638  -  []  230.77 279.22 90 top
NOREF#639  -  []  266.43 222.5 90 top
NOREF#640  -  []  142.88 226.99 0 top
NOREF#641  -  []  222.87 226.99 0 top
NOREF#642  -  []  146.16 193.35 0 top
NOREF#643  -  []  247.98 226.38 90 top
NOREF#644  -  []  159.65 212.56 0 top
NOREF#645  -  []  147.43 278.27 90 top
NOREF#646  -  []  272.25 222.59 90 top
NOREF#647  -  []  145.61 254.08 0 top
NOREF#648  -  []  186.01 184.91 90 top
NOREF#649  -  []  147.43 284.11 0 top
NOREF#650  -  []  246.32 209.17 0 top
NOREF#651  -  []  188.78 282.65 0 top
NOREF#652  -  []  192.25 218.02 90 top
NOREF#653  -  []  252.64 264.47 0 top
NOREF#654  -  []  239.24 184.35 0 top
NOREF#655  -  []  254.43 232.23 0 top
NOREF#656  -  []  203.84 201.77 0 top
NOREF#657  -  []  270.77 219.22 90 top
NOREF#658  -  []  156.45 187.71 0 top
NOREF#659  -  []  208.54 200.64 90 top
NOREF#660  -  []  204.95 207.27 90 top
NOREF#661  -  []  193.27 258.18 0 top
NOREF#662  -  []  228.99 180.62 0 top
NOREF#663  -  []  276.52 276.55 0 top
NOREF#664  -  []  233.76 190.88 90 top
NOREF#665  -  []  224.16 191.6 90 top
NOREF#666  -  []  194.78 236.5 90 top
NOREF#667  -  []  239.72 274.65 90 top
NOREF#668  -  []  192.25 278.02 0 top
NOREF#669  -  []  276.02 192.78 0 top
NOREF#670  -  []  158.64 233.37 90 top
NOREF#671  -  []  234.07 256.43 90 top
NOREF#672  -  []  155.17 221.32 0 top
NOREF#673  -  []  279.4 208.95 0 top
NOREF#674  -  []  263.49 253.03 90 top
NOREF#675  -  []  267.9 205.84 90 top
NOREF#676  -  []  178.95 264.09 0 top
NOREF#677  -  []  260.83 263.76 90 top
NOREF#678  -  []  168.42 200.97 90 top
NOREF#679  -  []  239.4 207.5 90 top
NOREF#680  -  []  140.95 206.12 90 top
NOREF#681  -  []  186.16 286.14 90 top
NOREF#682  -  []  283.84 213.41 90 top
NOREF#683  -  []  272.13 214.25 0 top
NOREF#684  -  []  156.1 276.42 90 top
NOREF#685  -  []  294.09 264.23 90 top
NOREF#686  -  []  195.17 276.75 90 top
NOREF#687  -  []  227.77 197.6 0 top
NOREF#688  -  []  179.08 268.59 0 top
NOREF#689  -  []  162.2 238.35 0 top
NOREF#690  -  []  239.27 214.21 0 top
NOREF#691  -  []  268.78 228.49 0 top
NOREF#692  -  []  145.61 192.78 0 top
NOREF#693  -  []  190.41 228.7 90 top
NOREF#694  -  []  239.06 238.07 0 top
NOREF#695  -  []  270.97 179.57 90 top
NOREF#696  -  []  283.97 204.45 90 top
NOREF#697  -  []  269.67 190.01 0 top
NOREF#698  -  []  149.84 213.7 0 top
NOREF#699  -  []  199.4 213.09 90 top
NOREF#700  -  []  251.05 289.49 0 top
NOREF#701  -  []  151.79 191.93 0 top
NOREF#702  -  []  229.72 226.19 0 top
NOREF#703  -  []  268.44 197.85 90 top
NOREF#704  -  []  193.27 193.35 0 top
NOREF#705  -  []  187.03 231.4 0 top
NOREF#706  -  []  283.97 268.95 0 top
NOREF#707  -  []  251.05 245.49 90 top
NOREF#708  -  []  201.41 227.9 90 top
NOREF#709  -  []  156.52 216.55 0 top
NOREF#710  -  []  268.99 191.93 0 top
NOREF#711  -  []  199.4 267.5 90 top
NOREF#712  -  []  149.72 221.62 0 top
NOREF#713  -  []  163.92 229.94 0 top
NOREF#714  -  []  195.49 168.7 90 top
NOREF#715  -  []  261.59 234.15 0 top
NOREF#716  -  []  218.95 268.91 0 top
NOREF#717  -  []  218.83 232.23 0 top
NOREF#718  -  []  230.88 228.6 90 top
NOREF#719  -  []  227.9 265.84 90 top
NOREF#720  -  []  163.84 265.58 0 top
NOREF#721  -  []  216 456.29 90 top
NOREF#722  -  []  288.39 456.29 90 top
NOREF#723  -  []  235.49 168.7 90 top
NOREF#724  -  []  133.36 261.22 0 top
NOREF#725  -  []  279.72 219.22 90 top
NOREF#726  -  []  228.78 244.35 0 top
NOREF#727  -  []  216.83 287.03 0 top
NOREF#728  -  []  274.07 191.6 90 top
NOREF#729  -  []  189.72 275.77 0 top
NOREF#730  -  []  165.04 233.3 90 top
NOREF#731  -  []  194.39 286.59 90 top
NOREF#732  -  []  178.97 18.69 90 top
NOREF#733  -  []  267.8 209.99 0 top
NOREF#734  -  []  193.39 253.03 90 top
NOREF#735  -  []  229.72 221.62 0 top
NOREF#736  -  []  157.92 190.01 0 top
NOREF#737  -  []  143.49 193.03 90 top
NOREF#738  -  []  197.92 190.01 0 top
NOREF#739  -  []  276.45 187.71 0 top
NOREF#740  -  []  243.84 205.58 0 top
NOREF#741  -  []  275.17 281.32 0 top
NOREF#742  -  []  147.43 278.27 0 top
NOREF#743  -  []  270.6 173.69 90 top
NOREF#744  -  []  62.86 375.04 0 top
NOREF#745  -  []  227.9 205.84 90 top
NOREF#746  -  []  279.27 267.82 90 top
NOREF#747  -  []  124.55 148.49 90 top
NOREF#748  -  []  199.22 250.88 90 top
NOREF#749  -  []  203.84 205.58 0 top
NOREF#750  -  []  250.02 274.45 0 top
NOREF#751  -  []  189.12 180.3 90 top
NOREF#752  -  []  218.95 204.09 0 top
NOREF#753  -  []  221.59 234.15 0 top
NOREF#754  -  []  183.49 193.03 90 top
NOREF#755  -  []  248.42 208.62 0 top
NOREF#756  -  []  256.55 280.49 0 top
NOREF#757  -  []  229.72 275.77 0 top
NOREF#758  -  []  159.27 270.87 90 top
NOREF#759  -  []  196.8 274.65 90 top
NOREF#760  -  []  276.57 242.05 0 top
NOREF#761  -  []  249.49 220.89 0 top
NOREF#762  -  []  235.05 218.82 0 top
NOREF#763  -  []  216.63 232.23 0 top
NOREF#764  -  []  193.98 238.07 0 top
NOREF#765  -  []  152.51 175.77 0 top
NOREF#766  -  []  206.32 262.32 0 top
NOREF#767  -  []  152.25 278.02 0 top
NOREF#768  -  []  230.97 179.57 90 top
NOREF#769  -  []  168.54 264.45 90 top
NOREF#770  -  []  209.52 272.86 90 top
NOREF#771  -  []  143.36 187.38 0 top
NOREF#772  -  []  270.6 233.69 0 top
NOREF#773  -  []  270.77 213.37 90 top
NOREF#774  -  []  268.89 392.33 90 top
NOREF#775  -  []  199.72 223.79 90 top
NOREF#776  -  []  186.16 198.18 0 top
NOREF#777  -  []  210.02 274.45 0 top
NOREF#778  -  []  161.44 184.35 0 top
NOREF#779  -  []  275.05 223.39 0 top
NOREF#780  -  []  279.72 223.79 90 top
NOREF#781  -  []  268.32 258.18 0 top
NOREF#782  -  []  238.11 172.1 0 top
NOREF#783  -  []  273.94 256.75 0 top
NOREF#784  -  []  270.56 192.78 0 top
NOREF#785  -  []  229.12 180.3 90 top
NOREF#786  -  []  242.2 178.35 0 top
NOREF#787  -  []  178.95 206.12 0 top
NOREF#788  -  []  284.95 210.32 90 top
NOREF#789  -  []  276.02 257.6 0 top
NOREF#790  -  []  219.72 273.6 90 top
NOREF#791  -  []  206.32 272.22 0 top
NOREF#792  -  []  140.83 268.59 90 top
NOREF#793  -  []  246.73 82.65 0 top
NOREF#794  -  []  203.97 210.55 90 top
NOREF#795  -  []  281.75 209.17 0 top
NOREF#796  -  []  149.84 219.54 90 top
NOREF#797  -  []  236.52 281.12 0 top
NOREF#798  -  []  203.84 200.97 90 top
NOREF#799  -  []  273.94 191.93 0 top
NOREF#800  -  []  159.27 200.97 90 top
NOREF#801  -  []  230.77 213.37 90 top
NOREF#802  -  []  239.4 264.45 90 top
NOREF#803  -  []  161.75 262.32 0 top
NOREF#804  -  []  196.57 245.63 90 top
NOREF#805  -  []  161.75 209.17 0 top
NOREF#806  -  []  176.38 264.09 90 top
NOREF#807  -  []  140.83 203.76 90 top
NOREF#808  -  []  171.05 292.28 90 top
NOREF#809  -  []  209.52 264.23 90 top
NOREF#810  -  []  246.32 272.22 0 top
NOREF#811  -  []  268.32 193.35 0 top
NOREF#812  -  []  132.87 227.4 90 top
NOREF#813  -  []  276.57 182.05 0 top
NOREF#814  -  []  189.84 284.11 90 top
NOREF#815  -  []  149.68 334.65 0 top
NOREF#816  -  []  188.81 190.88 90 top
NOREF#817  -  []  148.95 206.89 0 top
NOREF#818  -  []  122.2 178.35 0 top
NOREF#819  -  []  199.27 264.78 90 top
NOREF#820  -  []  241.84 295.2 0 top
NOREF#821  -  []  141.55 207.14 90 top
NOREF#822  -  []  133.62 289.09 90 top
NOREF#823  -  []  242.2 178.35 0 top
NOREF#824  -  []  277.04 184.35 0 top
NOREF#825  -  []  147.9 205.84 90 top
NOREF#826  -  []  186.16 212.17 90 top
NOREF#827  -  []  267.99 178.35 0 top
NOREF#828  -  []  254.38 204.09 0 top
NOREF#829  -  []  208.54 264.45 90 top
NOREF#830  -  []  228.32 185.63 90 top
NOREF#831  -  []  209.55 237.49 0 top
NOREF#832  -  []  235.17 272.17 90 top
NOREF#833  -  []  174.43 232.23 0 top
NOREF#834  -  []  260.83 205.79 90 top
NOREF#835  -  []  231.53 233.37 90 top
NOREF#836  -  []  189.84 213.7 90 top
NOREF#837  -  []  128.45 235.2 0 top
NOREF#838  -  []  239.44 239.15 0 top
NOREF#839  -  []  275.68 233.69 90 top
NOREF#840  -  []  186.16 258.18 0 top
NOREF#841  -  []  267.9 265.84 90 top
NOREF#842  -  []  187.8 204.99 90 top
NOREF#843  -  []  218.35 271.84 0 top
NOREF#844  -  []  173.45 184.35 0 top
NOREF#845  -  []  156.02 236.37 0 top
NOREF#846  -  []  196.7 257.85 90 top
NOREF#847  -  []  154.39 216.17 90 top
NOREF#848  -  []  193.18 222.26 90 top
NOREF#849  -  []  247.95 226.12 90 top
NOREF#850  -  []  106.68 148.34 90 top
NOREF#851  -  []  293.02 392.33 90 top
NOREF#852  -  []  197.5 185.31 90 top
NOREF#853  -  []  317.15 392.33 90 top
NOREF#854  -  []  170.89 262.32 0 top
NOREF#855  -  []  266.16 200.17 90 top
NOREF#856  -  []  142.81 247.68 0 top
NOREF#857  -  []  281.75 262.32 0 top
NOREF#858  -  []  134.07 210.89 90 top
NOREF#859  -  []  268.78 282.65 0 top
NOREF#860  -  []  272.63 172.86 0 top
NOREF#861  -  []  150.41 168.7 90 top
NOREF#862  -  []  156.81 232.54 0 top
NOREF#863  -  []  150.21 82.65 0 top
NOREF#864  -  []  106.83 148.19 90 top
NOREF#865  -  []  142.81 192.78 0 top
NOREF#866  -  []  259.08 203.76 0 top
NOREF#867  -  []  267.05 209.24 0 top
NOREF#868  -  []  196.57 258.18 0 top
NOREF#869  -  []  288.42 201.77 0 top
NOREF#870  -  []  153.6 216.55 0 top
NOREF#871  -  []  276.33 227.9 90 top
NOREF#872  -  []  258.95 206.12 0 top
NOREF#873  -  []  227.23 18.69 90 top
NOREF#874  -  []  203.97 212 0 top
NOREF#875  -  []  123.4 281.8 0 top
NOREF#876  -  []  192.25 212.18 90 top
NOREF#877  -  []  180.95 208.91 90 top
NOREF#878  -  []  209.52 210.32 90 top
NOREF#879  -  []  204.95 264.23 90 top
NOREF#880  -  []  277.74 166.36 90 top
NOREF#881  -  []  209.52 204.23 90 top
NOREF#882  -  []  150.56 252.5 0 top
NOREF#883  -  []  175.11 201.22 90 top
NOREF#884  -  []  286.32 272.22 0 top
NOREF#885  -  []  228.95 206.89 0 top
NOREF#886  -  []  279.22 190.88 90 top
NOREF#887  -  []  190.77 283.79 90 top
NOREF#888  -  []  154.63 286.99 0 top
NOREF#889  -  []  147.77 181.47 0 top
NOREF#890  -  []  156.1 280.99 90 top
NOREF#891  -  []  180.43 284.38 90 top
NOREF#892  -  []  124.44 292.28 90 top
NOREF#893  -  []  221.03 267.69 90 top
NOREF#894  -  []  239.27 200.97 90 top
NOREF#895  -  []  312.52 456.29 90 top
NOREF#896  -  []  160.23 176.17 90 top
NOREF#897  -  []  179.08 205.79 0 top
NOREF#898  -  []  154.39 226.59 90 top
NOREF#899  -  []  153.18 222.26 90 top
NOREF#900  -  []  186.96 191.6 90 top
NOREF#901  -  []  261.59 294.14 0 top
NOREF#902  -  []  188.81 250.88 90 top
NOREF#903  -  []  145.61 252.5 0 top
NOREF#904  -  []  200.23 176.17 90 top
NOREF#905  -  []  124.61 294.89 90 top
NOREF#906  -  []  152.25 282.59 90 top
NOREF#907  -  []  269.72 215.77 0 top
NOREF#908  -  []  226.28 197.85 90 top
NOREF#909  -  []  159.24 184.35 0 top
NOREF#910  -  []  228.78 288.49 0 top
NOREF#911  -  []  230.6 233.69 90 top
NOREF#912  -  []  119.48 456.29 0 top
NOREF#913  -  []  237.04 184.35 0 top
NOREF#914  -  []  276.57 185.63 0 top
NOREF#915  -  []  279.4 202.09 0 top
NOREF#916  -  []  275.58 262.67 90 top
NOREF#917  -  []  164.95 270.32 90 top
NOREF#918  -  []  184.16 251.6 90 top
NOREF#919  -  []  216.38 204.09 90 top
NOREF#920  -  []  250.89 266.13 0 top
NOREF#921  -  []  138.95 201.55 0 top
NOREF#922  -  []  163.4 236.38 0 top
NOREF#923  -  []  257.25 236.5 90 top
NOREF#924  -  []  211.05 289.49 0 top
NOREF#925  -  []  272.25 272.17 90 top
NOREF#926  -  []  159.4 262.09 0 top
NOREF#927  -  []  168.42 268.62 0 top
NOREF#928  -  []  89.74 155.92 0 top
NOREF#929  -  []  147.51 250.88 90 top
NOREF#930  -  []  136.55 254.49 90 top
NOREF#931  -  []  157.28 264.37 0 top
NOREF#932  -  []  273.83 172.21 90 top
NOREF#933  -  []  251.21 234.89 90 top
NOREF#934  -  []  218.35 269.04 0 top
NOREF#935  -  []  278.64 173.37 90 top
NOREF#936  -  []  261.55 265.11 90 top
NOREF#937  -  []  150.6 173.69 90 top
NOREF#938  -  []  225.09 257.49 90 top
NOREF#939  -  []  155.92 195.7 90 top
NOREF#940  -  []  220.95 268.91 90 top
NOREF#941  -  []  307.66 457.2 0 top
NOREF#942  -  []  156.54 167 0 top
NOREF#943  -  []  227.99 178.35 0 top
NOREF#944  -  []  184.04 251.93 0 top
NOREF#945  -  []  181.22 76.69 90 top
NOREF#946  -  []  224.04 196.75 0 top
NOREF#947  -  []  131.22 234.89 90 top
NOREF#948  -  []  140.95 268.91 90 top
NOREF#949  -  []  276.57 253.35 0 top
NOREF#950  -  []  237.04 184.35 0 top
NOREF#951  -  []  277.37 240.3 90 top
NOREF#952  -  []  290.89 262.32 0 top
NOREF#953  -  []  269.84 279.54 90 top
NOREF#954  -  []  234.39 282.02 90 top
NOREF#955  -  []  271.91 196.43 90 top
NOREF#956  -  []  88.14 134.87 0 top
NOREF#957  -  []  279.4 265.9 0 top
NOREF#958  -  []  234.39 222.02 90 top
NOREF#959  -  []  234.33 264.33 90 top
NOREF#960  -  []  280.23 176.17 90 top
NOREF#961  -  []  180.83 201.22 90 top
NOREF#962  -  []  235.05 214.25 0 top
NOREF#963  -  []  229.12 240.3 90 top
NOREF#964  -  []  236.84 167.33 0 top
NOREF#965  -  []  233.6 216.55 0 top
NOREF#966  -  []  164.61 234.89 90 top
NOREF#967  -  []  90.49 457.2 0 top
NOREF#968  -  []  254.43 292.23 0 top
NOREF#969  -  []  236.8 220.49 90 top
NOREF#970  -  []  146.28 257.85 90 top
NOREF#971  -  []  279.22 179.57 90 top
NOREF#972  -  []  152.46 252.5 90 top
NOREF#973  -  []  155.17 216.75 0 top
NOREF#974  -  []  114.61 17.78 0 top
NOREF#975  -  []  155.17 276.75 90 top
NOREF#976  -  []  199.27 201.77 0 top
NOREF#977  -  []  136.83 227.03 0 top
NOREF#978  -  []  243.97 204.45 90 top
NOREF#979  -  []  283.52 83.81 0 top
NOREF#980  -  []  163.97 208.95 0 top
NOREF#981  -  []  159.4 204.45 90 top
NOREF#982  -  []  226.28 193.03 90 top
NOREF#983  -  []  288.54 265.9 0 top
NOREF#984  -  []  263.36 187.38 0 top
NOREF#985  -  []  226.28 257.85 90 top
NOREF#986  -  []  233.39 197.85 90 top
NOREF#987  -  []  204.95 260.42 90 top
NOREF#988  -  []  248.54 205.9 0 top
NOREF#989  -  []  197.03 178.07 0 top
NOREF#990  -  []  207.98 286.38 90 top
NOREF#991  -  []  218.97 271.91 90 top
NOREF#992  -  []  173.36 261.22 0 top
NOREF#993  -  []  213.62 229.09 90 top
NOREF#994  -  []  155.68 173.69 0 top
NOREF#995  -  []  186.28 253.03 90 top
NOREF#996  -  []  263.36 258.18 0 top
NOREF#997  -  []  163.84 208.62 0 top
NOREF#998  -  []  154.62 252.5 90 top
NOREF#999  -  []  159.27 210.87 90 top
NOREF#1000  -  []  238.11 232.1 0 top
NOREF#1001  -  []  181.85 246.47 0 top
NOREF#1002  -  []  151.76 167.33 0 top
NOREF#1003  -  []  130.58 263.21 90 top
NOREF#1004  -  []  149.67 236.37 90 top
NOREF#1005  -  []  228.35 277.95 90 top
NOREF#1006  -  []  131.05 289.49 0 top
NOREF#1007  -  []  214.09 260.42 90 top
NOREF#1008  -  []  266.43 236.47 90 top
NOREF#1009  -  []  195.05 283.39 0 top
NOREF#1010  -  []  203.04 236.5 90 top
NOREF#1011  -  []  261.55 209.94 90 top
NOREF#1012  -  []  283.84 211.67 0 top
NOREF#1013  -  []  277.25 191.93 0 top
NOREF#1014  -  []  243.97 265.9 0 top
NOREF#1015  -  []  208.54 262.09 0 top
NOREF#1016  -  []  235.17 276.75 90 top
NOREF#1017  -  []  140.83 208.59 90 top
NOREF#1018  -  []  243.84 213.41 90 top
NOREF#1019  -  []  197.74 226.35 90 top
NOREF#1020  -  []  280.23 236.17 90 top
NOREF#1021  -  []  236.81 232.54 0 top
NOREF#1022  -  []  131.26 244.35 0 top
NOREF#1023  -  []  149.12 196.43 90 top
NOREF#1024  -  []  202.2 238.35 0 top
NOREF#1025  -  []  197.37 191.6 90 top
NOREF#1026  -  []  152.25 282.59 0 top
NOREF#1027  -  []  219.55 234.49 0 top
NOREF#1028  -  []  155.17 212.18 90 top
NOREF#1029  -  []  201.75 202.32 0 top
NOREF#1030  -  []  278.64 233.37 90 top
NOREF#1031  -  []  288.54 205.9 0 top
NOREF#1032  -  []  188.81 195.7 90 top
NOREF#1033  -  []  248.42 264.78 90 top
NOREF#1034  -  []  186.16 193.35 0 top
NOREF#1035  -  []  146.7 237.02 90 top
NOREF#1036  -  []  134.51 203.76 0 top
NOREF#1037  -  []  201.75 262.32 0 top
NOREF#1038  -  []  275.05 274.25 0 top
NOREF#1039  -  []  264.04 256.75 0 top
NOREF#1040  -  []  237.5 245.31 90 top
NOREF#1041  -  []  149.84 279.54 90 top
NOREF#1042  -  []  239.72 283.79 90 top
NOREF#1043  -  []  199.72 279.22 90 top
NOREF#1044  -  []  196.57 182.05 0 top
NOREF#1045  -  []  168.54 208.95 0 top
NOREF#1046  -  []  194.39 222.02 90 top
NOREF#1047  -  []  176.26 203.76 90 top
NOREF#1048  -  []  264.26 456.29 90 top
NOREF#1049  -  []  149.67 247.68 90 top
NOREF#1050  -  []  279.4 207.5 90 top
NOREF#1051  -  []  138.95 268.91 0 top
NOREF#1052  -  []  168.54 265.9 0 top
NOREF#1053  -  []  239.27 264.78 90 top
NOREF#1054  -  []  191.79 191.93 0 top
NOREF#1055  -  []  267.03 171.4 0 top
NOREF#1056  -  []  270.77 223.79 90 top
NOREF#1057  -  []  268.32 245.63 90 top
NOREF#1058  -  []  147.77 251.31 0 top
NOREF#1059  -  []  147.77 247.68 0 top
NOREF#1060  -  []  138.56 246.51 0 top
NOREF#1061  -  []  150.77 219.22 90 top
NOREF#1062  -  []  244.44 232.28 90 top
NOREF#1063  -  []  227.77 241.47 0 top
NOREF#1064  -  []  199.4 207.5 90 top
NOREF#1065  -  []  226.7 283.04 90 top
NOREF#1066  -  []  154.78 176.5 90 top
NOREF#1067  -  []  139.73 178.35 0 top
NOREF#1068  -  []  197.25 256.75 0 top
NOREF#1069  -  []  204.44 232.28 90 top
NOREF#1070  -  []  265.41 273.02 90 top
NOREF#1071  -  []  165.38 226.23 0 top
NOREF#1072  -  []  223.89 245.24 90 top
NOREF#1073  -  []  123.92 289.94 0 top
NOREF#1074  -  []  276.57 245.63 0 top
NOREF#1075  -  []  173.65 179.15 0 top
NOREF#1076  -  []  276.79 171.3 0 top
NOREF#1077  -  []  147.3 226.19 0 top
NOREF#1078  -  []  267.43 218.27 0 top
NOREF#1079  -  []  204.32 231.95 90 top
NOREF#1080  -  []  169.52 210.32 90 top
NOREF#1081  -  []  125.08 17.15 0 top
NOREF#1082  -  []  149.21 17.15 0 top
NOREF#1083  -  []  251.25 244.35 0 top
NOREF#1084  -  []  268.35 283.79 90 top
NOREF#1085  -  []  263.89 245.24 90 top
NOREF#1086  -  []  146.28 197.85 90 top
NOREF#1087  -  []  151.24 253.03 90 top
NOREF#1088  -  []  239.4 270.55 90 top
NOREF#1089  -  []  83.04 164.54 90 top
NOREF#1090  -  []  175.65 184.35 0 top
NOREF#1091  -  []  217.25 176.5 90 top
NOREF#1092  -  []  147.3 220.35 0 top
NOREF#1093  -  []  136.63 232.23 0 top
NOREF#1094  -  []  231.95 178.07 0 top
NOREF#1095  -  []  240.23 176.17 90 top
NOREF#1096  -  []  158.89 259.3 0 top
NOREF#1097  -  []  260.95 206.12 90 top
NOREF#1098  -  []  168.54 207.5 90 top
NOREF#1099  -  []  216.26 203.76 90 top
NOREF#1100  -  []  294.09 260.42 90 top
NOREF#1101  -  []  244.61 294.89 90 top
NOREF#1102  -  []  228.78 184.35 0 top
NOREF#1103  -  []  249.52 264.23 90 top
NOREF#1104  -  []  228.32 258.18 0 top
NOREF#1105  -  []  157.25 191.93 0 top
